# Altium PCB Demo.PcbDoc
Units mil, origin at the board's own origin, x right, y up, seen from the top; angles counter-clockwise.
Board outline 1574.8 x 984.25 mil, 2 copper layers (Top Layer, Bottom Layer), stack 63.036 mil thick; 4 components, 3 nets, 10 pads, 3 vias.
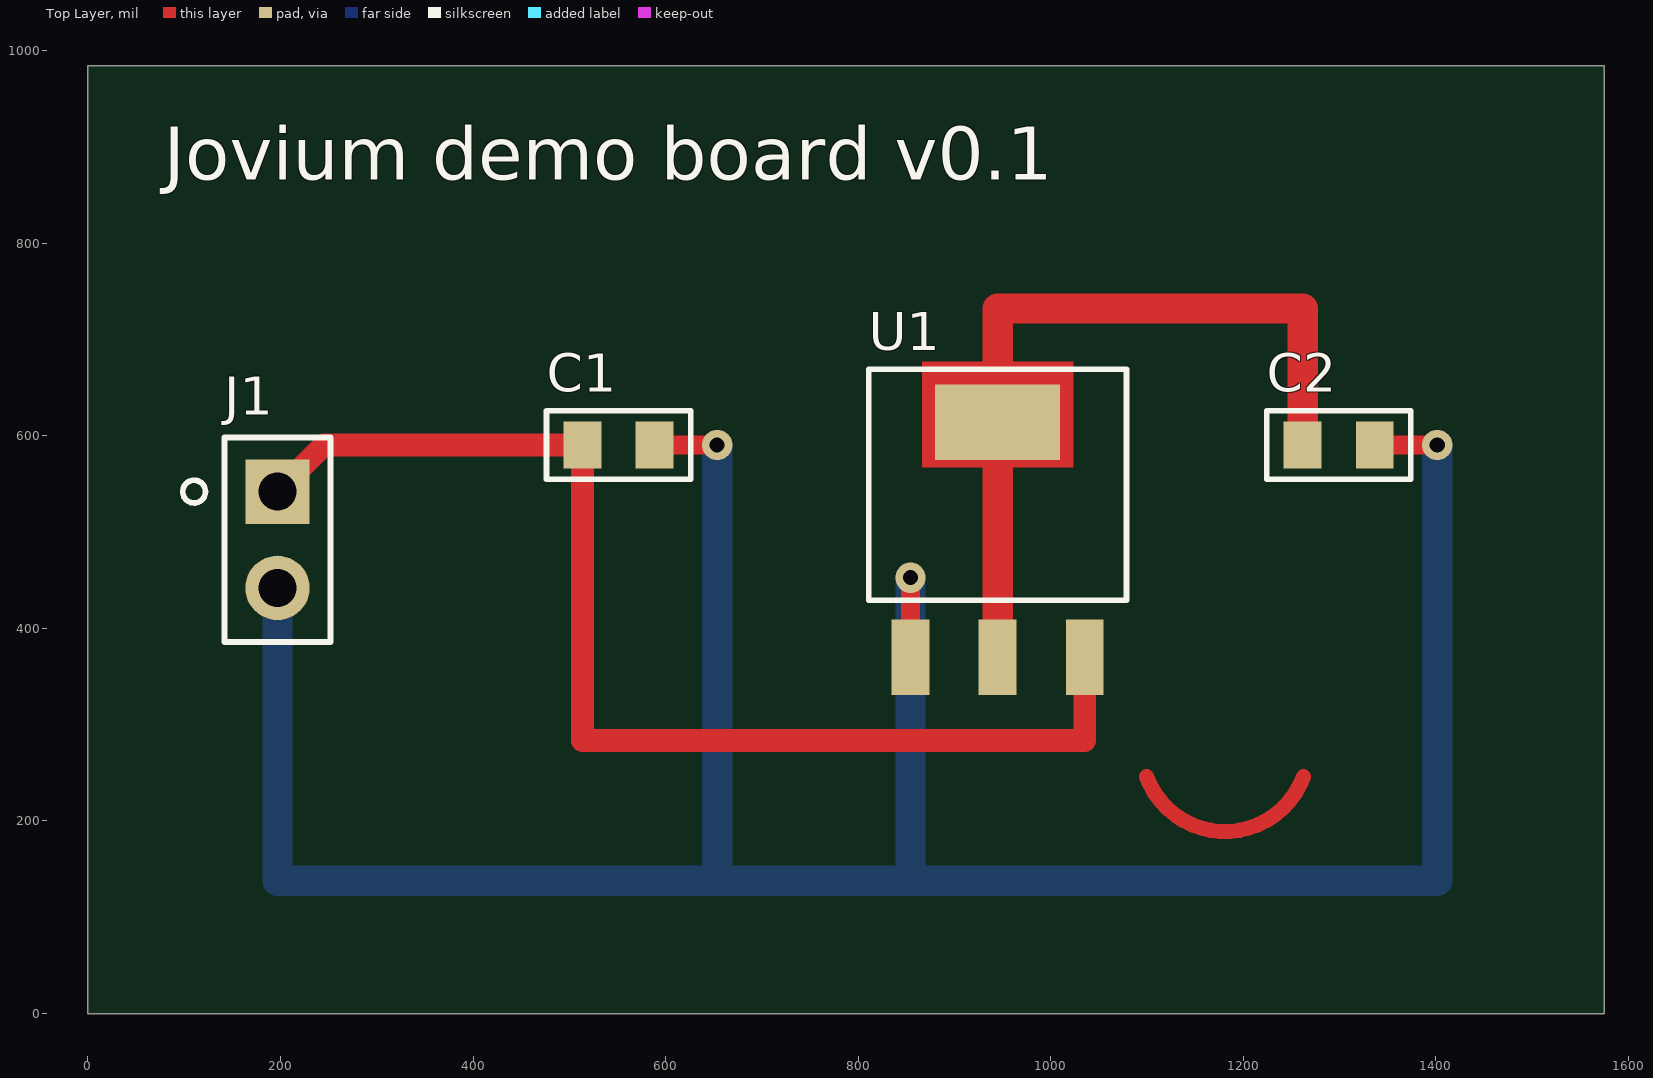
[diagram p0: Top Layer view]
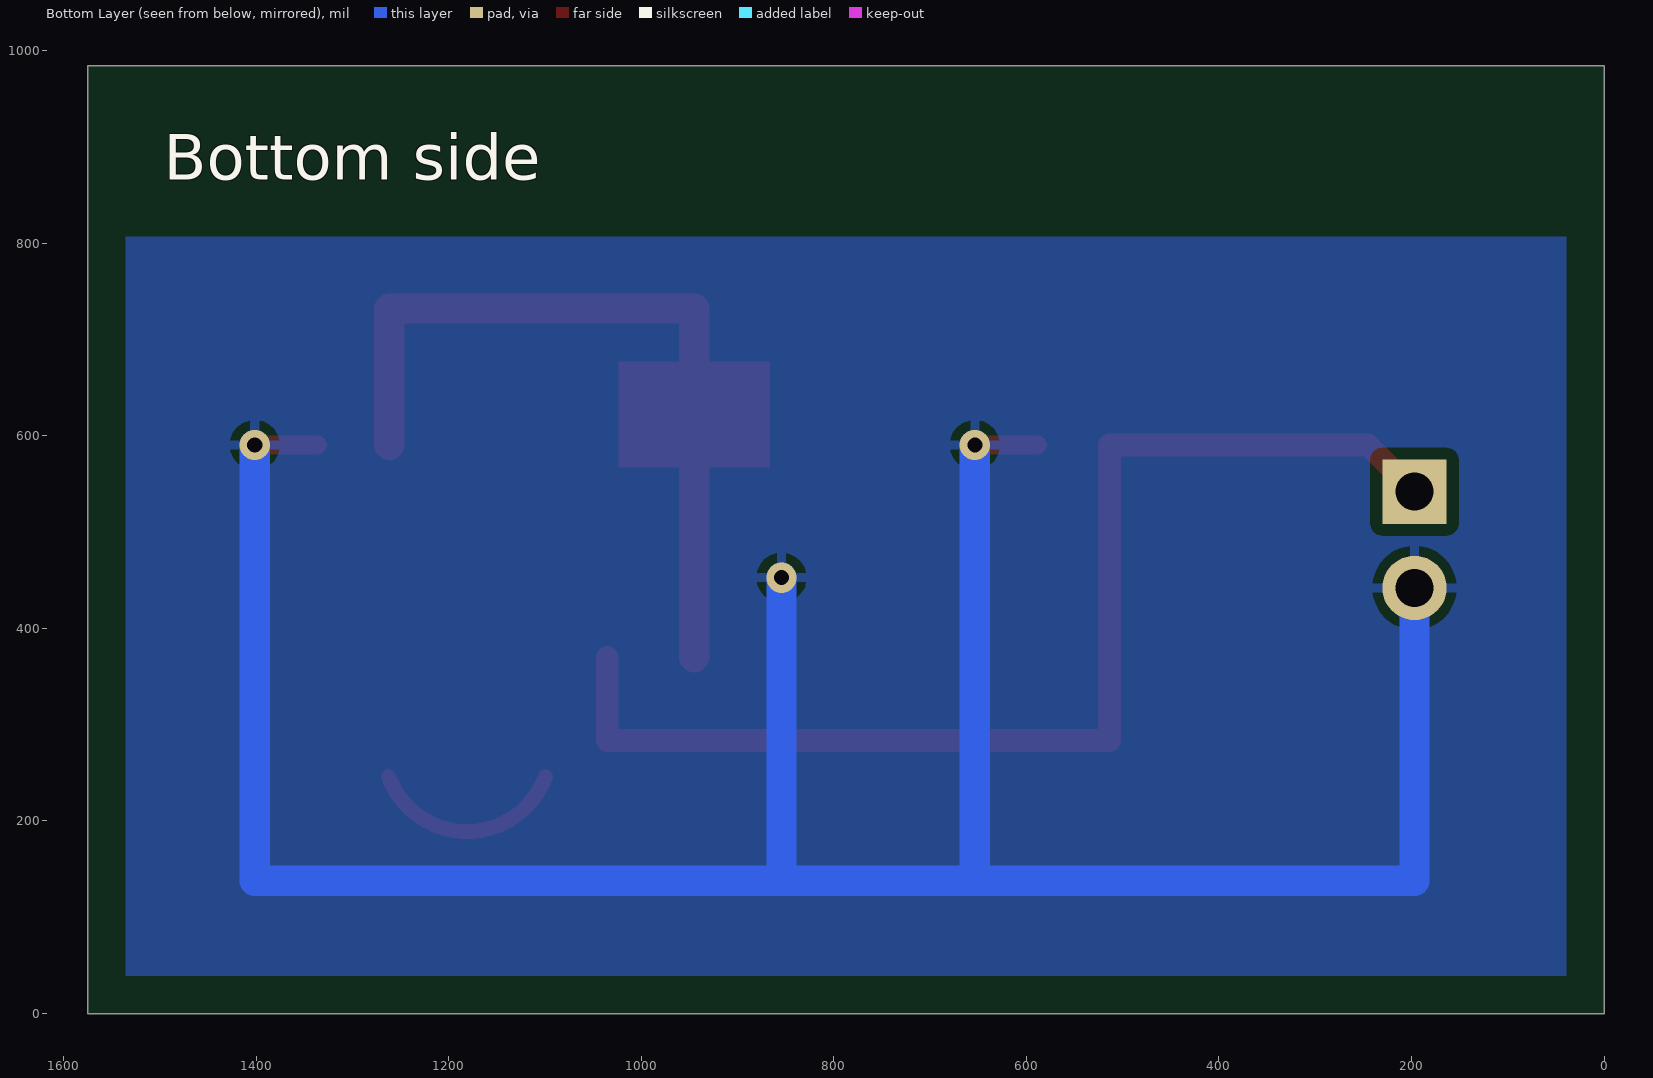
[diagram p1: Bottom Layer view, seen from below]

## Layer stack, top to bottom
Top Solder: solder mask 0.4, Solder Resist, Dk 3.5
Top Layer: signal copper 1.4
Dielectric 1: core 60.2362, FR-4, Dk 4.2
Bottom Layer: signal copper 1.4
Bottom Solder: solder mask 0.4, Solder Resist, Dk 3.5

## Board outline
0,0 1574.8,0 1574.8,984.25 0,984.25

## Design rules (kind name [scope] priority, off if disabled: settings)
Clearance Clearance_Power [InNetClass('Power')] p1: gap=12
Clearance [All] p2: gap=10
Height [All] p1: minheight=0 prefheight=500 maxheight=1000
HoleSize [All] p1: minlimit=1 maxlimit=100
HoleToHoleClearance [All] p1: gap=10
PolygonConnect [All] p1: reliefconductorwidth=10 airgapwidth=10 connectstyle=Relief reliefentries=4
RoutingVias [All] p1: minwidth=50 width=50 maxwidth=50 minholewidth=28 holewidth=28 maxholewidth=28
SilkToSolderMaskClearance [IsPad] p1: minsilkscreentomaskgap=5 clearancetoexposedcopper=TRUE
SolderMaskExpansion [All] p1: expansion=4
Width [All] p1: minlimit=10 preferedwidth=20 maxlimit=40
6 further rules are at their usual default settings.

## Classes and differential pairs
net class Power: +3V3 VIN

## Components (designator, comment, footprint, x,y, rotation, side; value= is the part's Value field where it differs from the comment)
C1 "" 0805 551.18,590.55 r0 top
C2 "" 0805 1299.21,590.55 r0 top
J1 "" HDR1X2 196.85,492.13 r0 top
U1 "LDO 3V3" SOT-223 944.88,492.13 r0 top

## Footprints (in the part's own frame and the unit in brackets; to place one, negate y for a bottom-side part, rotate by r counter-clockwise, add the part's x,y. Pads: shape width x height; smd on the part's side, far side on the other; paste and mask are expansions set on the pad)
0805 [mm]
  rect 1x1.25 smd: 1(-0.95,0) 2(0.95,0)
  silkscreen extent -1.9,-0.9 1.9,0.9, body extent -1,-0.64 1,0.64, height 1.2
HDR1X2 [mm]
  rect 1.7x1.7 hole 1: 1(0,1.27)
  round 1.7 hole 1: 2(0,-1.27)
  silkscreen extent -2.5,-2.7 1.4,2.7, body extent -1.27,-2.54 1.27,2.54, height 8.5
SOT-223 [mm]
  rect 1x2 smd: 1(-2.3,-3.1) 2(0,-3.1) 3(2.3,-3.1)
  rect 3.3x2 smd: 4(0,3.1)
  silkscreen extent -3.4,-1.6 3.4,4.5, body extent -3.25,-3.45 3.25,3.3, height 1.7

## Via types
v1: diameter 31.5, hole 15.75, Top Layer to Bottom Layer, 3 vias

## Nets (pads, with @x,y where several pads share a name; then routed paths per layer and width w, separated by ;. In a path a pad name is that pad's centre, name@x,y a point inside that pad or via, vN(x,y) a via of type N, cw(c..) or ccw(c..) an arc to the next point about the centre after c; other vN are vias at no path point)
+3V3: C2.1 U1.2 U1.4 | length 1032.5
  Top Layer w15.75: 1099.71,245.97 ccw(c1181.1,275.59) 1262.49,245.97
  Top Layer w31.5: U1.2 U1.4 944.88,732.28 1261.81,732.28 C2.1
GND: C1.2 C2.2 J1.2 U1.1 | length 2942.1
  Top Layer w19.68: C1.2 v1(653.54,590.55) ; U1.1 v1(854.33,452.76) ; C2.2 v1(1401.57,590.55)
  Bottom Layer w31.5: J1.2 196.85,137.8 1401.57,137.8 v1(1401.57,590.55) ; 653.54,137.8 v1(653.54,590.55) ; 854.33,137.8 v1(854.33,452.76)
VIN: C1.1 J1.1 U1.3 | length 1252.3
  Top Layer w23.62: J1.1 245.28,590.55 C1.1 513.78,283.46 1035.43,283.46 U1.3

## Polygon pours and split planes (outlines as drawn)
GND on Bottom Layer "GND_L2_P000" (solid, remove dead copper, pour order 0): 39.37,39.37 1535.43,39.37 1535.43,807.09 39.37,807.09

## Other copper
Top Layer:
  rectangle net +3V3: 866.14,566.93 1023.62,677.17

## Silkscreen, mask and mechanical layers (free items; w line width, h text height)
Top Overlay:
  text "Jovium demo board v0.1" at 78.74,866.14 h55.12
Bottom Overlay:
  text "Bottom side" at 1496.06,866.14 h47.24
Drill Drawing:
  text ".Legend" at 0,-196.85 h47.24

## Dimensions
0,0 to 1574.8,0 on Mechanical 1
1574.8,0 to 1574.8,984.25 on Mechanical 1